# Altium PCB OFP_MCM_v1.6.PcbDoc (part 6 of 8)
Units mm, origin at the board's own origin, x right, y up, seen from the top; angles counter-clockwise.
Board outline 110 x 120 mm, 4 copper layers (Top Layer, Layer 1, Layer 2, Bottom Layer), stack 1.576 mm thick; 381 components, 285 nets, 1332 pads, 552 vias.
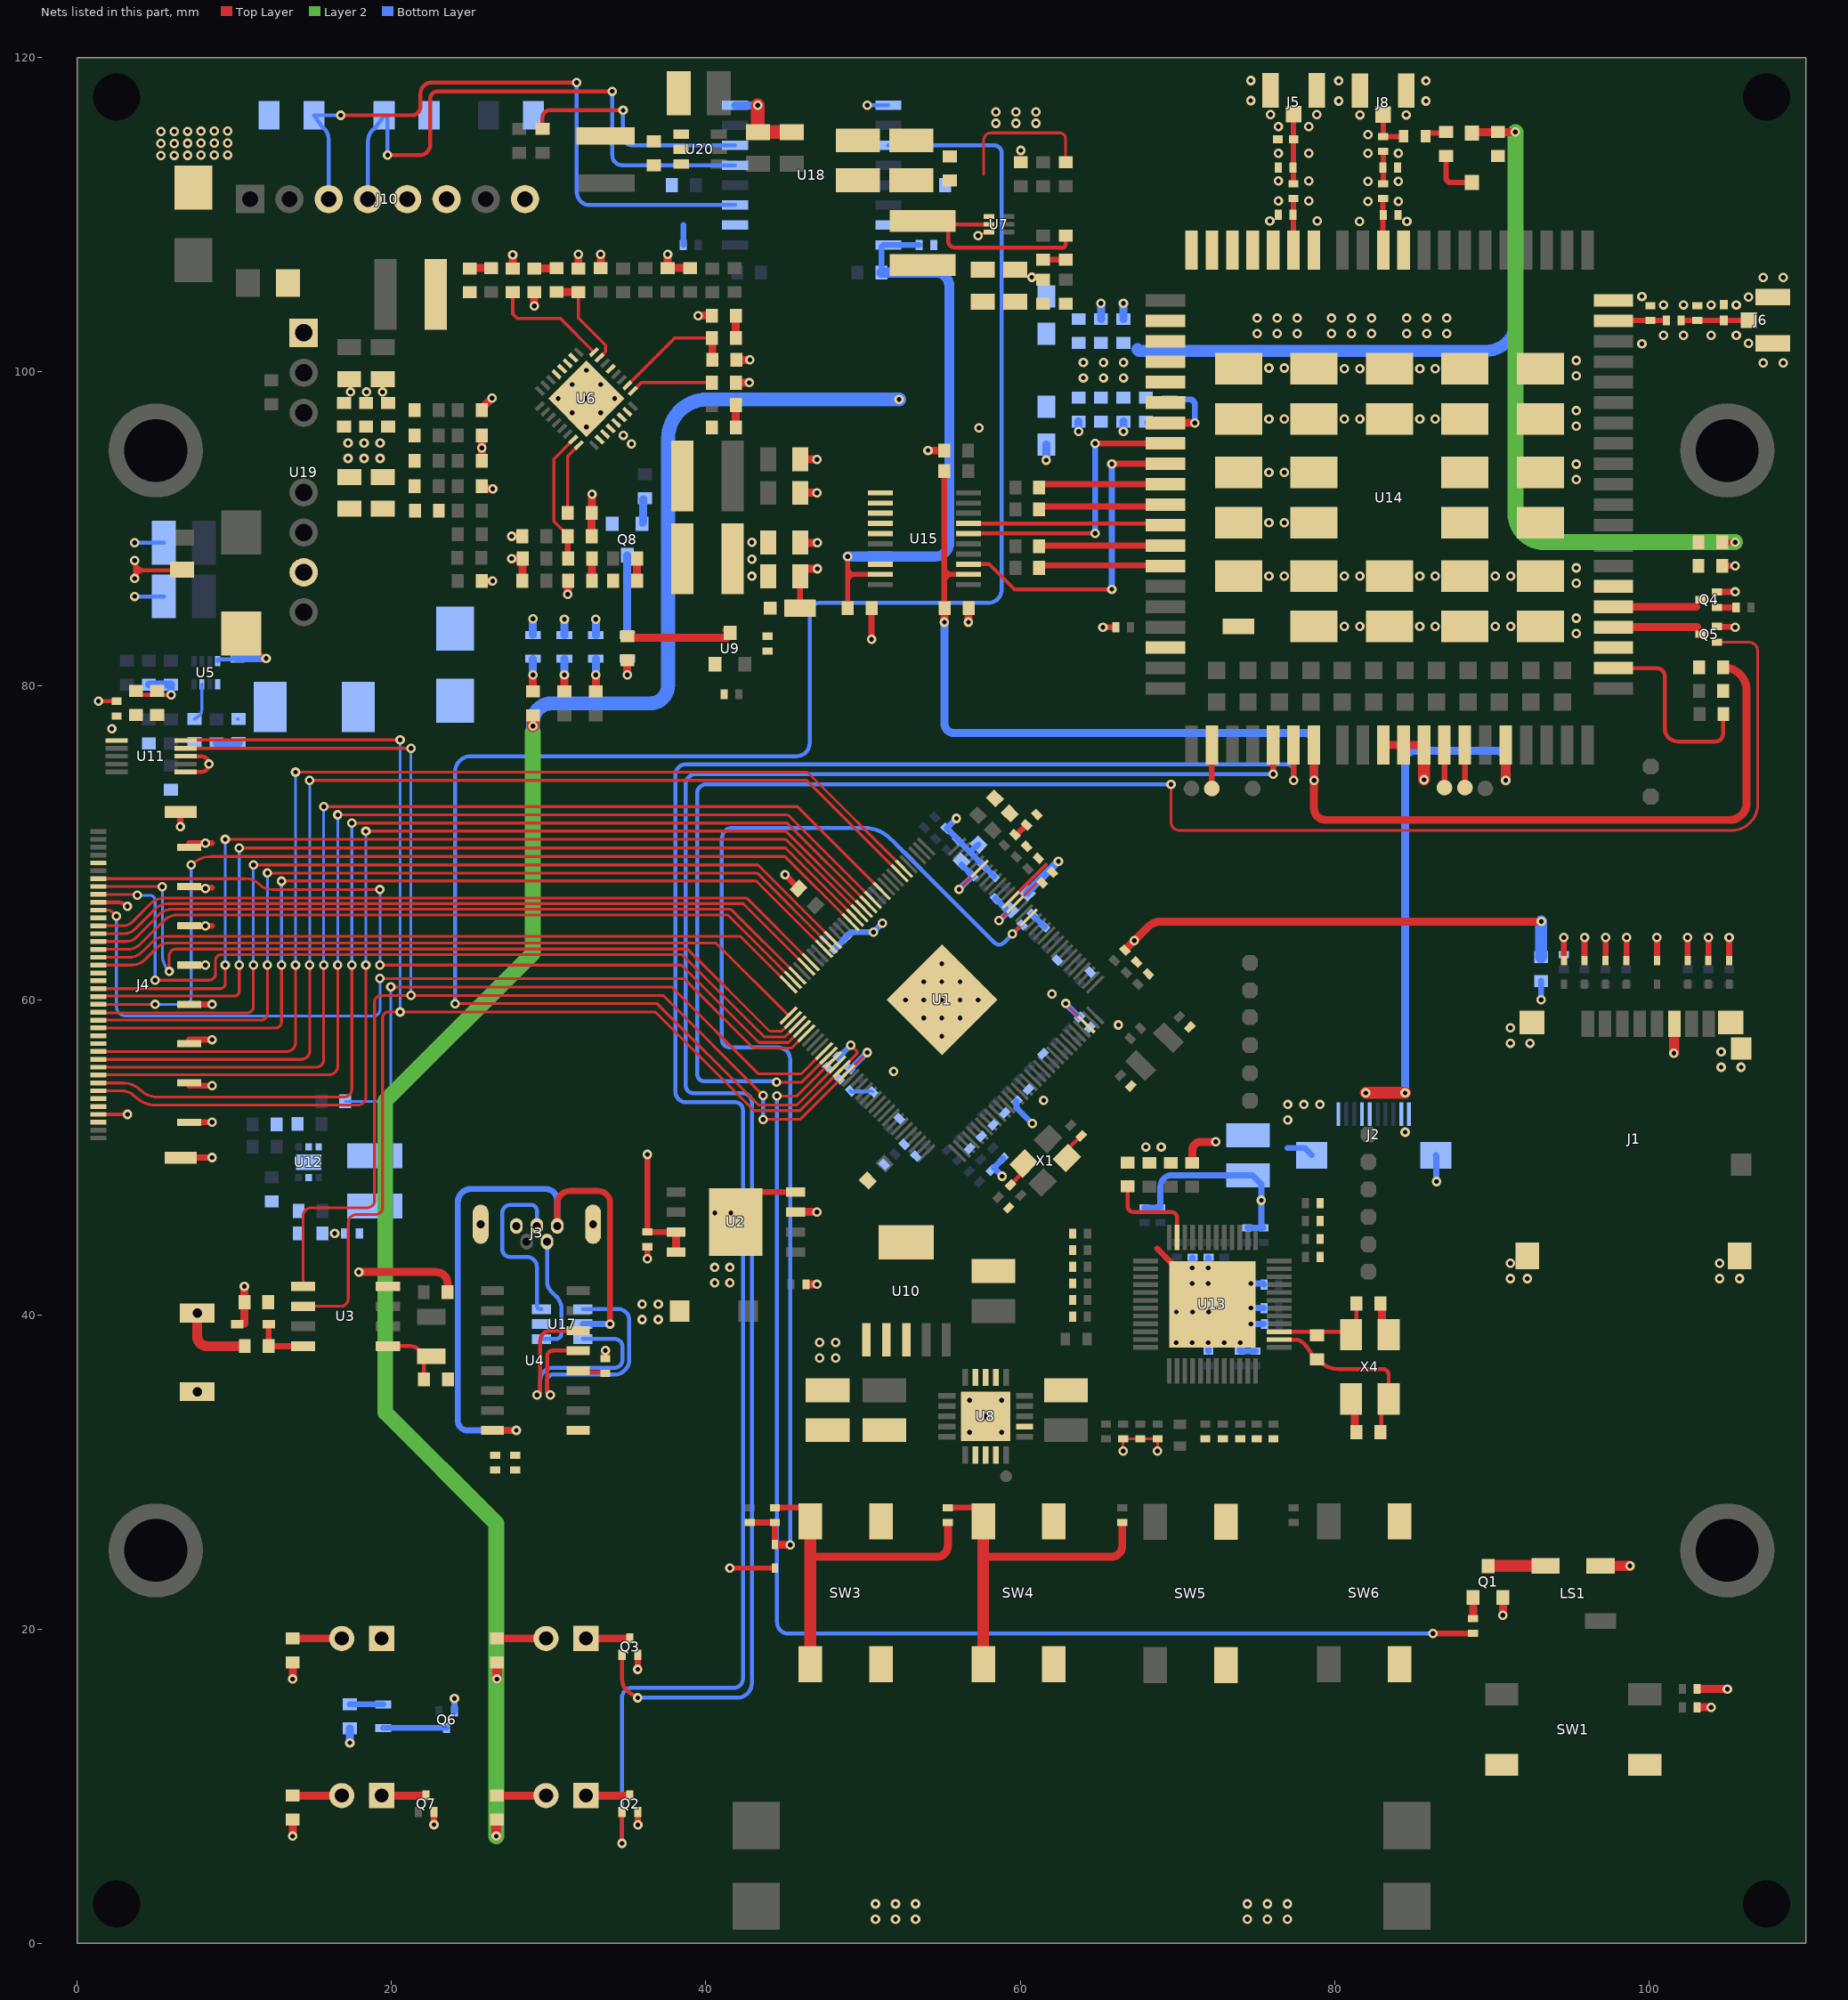
[diagram p5: the nets of this part, all layers, seen from the top]

## Via types
v1: diameter 0.6, hole 0.3, Top Layer to Bottom Layer, tented both sides, 552 vias

## Nets (pads, with @x,y where several pads share a name; then routed paths per layer and width w, separated by ;. In a path a pad name is that pad's centre, name@x,y a point inside that pad or via, vN(x,y) a via of type N, cw(c..) or ccw(c..) an arc to the next point about the centre after c; other vN are vias at no path point) (continued)
+3.3V: C4.2 C7.2 C9.2 C66.1 C67.2 C68.2 C87.2 C93.2 C94.2 C95.2 C140.2 C150.1 D9.1 D13.2 J4.4 J4.31 L3.2 LS1.1 R1.2 R8.2 R10.2 R18.1 R19.1 R20.1 R21.1 R28.1 R53.1 R77.2 R81.2 R120.2 R121.2 R124.2 U2.3 U2.7 U2.8 U9.3 U11.1 U15.19 U18.16 | length 106.4
  Top Layer w0.254: J4.4@1.345,52.75 v1(3.209,52.75) ; J4.31@1.345,66.25 2.545,66.25 cw(c2.545,65.338) 2.902,66.177 cw(c2.545,65.338) v1(3.191,65.983) ; 10.583,39.394 ccw(c10.583,39.448) 10.637,39.448 ; U9.3@41.144,83.566 cw(c41.144,83.003) U9.3@41.542,83.401 ; R28.1@66.663,63.202 R28.1@66.742,63.282
  Top Layer w0.305: C140.2@49.022,84.963 49.022,86.677 ; v1(49.022,88.249) 49.022,87.541 ; 49.073,87.109 49.454,87.109 ; U15.19@50.729,87.109 49.454,87.109 ; 49.022,86.677 cw(c49.454,86.677) 49.454,87.109 ; 49.022,86.677 49.022,87.541 ; 49.022,87.541 ccw(c49.454,87.541) 49.454,87.109
  Top Layer w0.381: C7.2@36.279,45.265 v1(36.279,50.201) ; C7.2@36.5,45.303 36.538,45.265 U2.7@38.115,45.265
  Top Layer w0.508: 10.637,39.448 v1(10.637,41.806) ; v1(13.716,6.815) R121.2@13.716,7.876 ; v1(13.716,16.815) R77.2@13.716,17.876 ; v1(17.917,42.718) 22.827,42.718 cw(c22.827,41.973) 23.572,41.973 R20.1@23.572,41.439 ; v1(27.64,88.119) R53.1@28.335,88.119 ; C66.1@28.33,86.705 28.335,86.71 R53.1@28.335,88.119 ; R53.1@28.34,88.124 R53.1@28.335,88.119 ; R81.2@35,83.185 35.111,83.073 U9.3@41.373,83.073 ; U2.8@38.115,43.995 U2.7@38.115,45.265 ; U2.3@45.715,46.535 47.066,46.535 v1(47.066,46.533) ; R10.2@46.438,41.935 v1(47.066,41.935) ; R28.1@66.742,63.282 66.742,63.292 v1(67.267,63.817) 68.131,64.68 cw(c68.959,63.854) 68.959,65.024 v1(93.164,65.024) ; R1.2@103.195,16.18 v1(105.004,16.18)
  Top Layer w0.635: LS1.1@96.933,24.015 v1(98.806,24.015)
  Bottom Layer w0.254: v1@17.305,12.713 ccw(c17.305,12.756) v1(17.349,12.756)
  Bottom Layer w0.381: R124.2@51.179,106.325 51.179,107.966 51.289,108.076 U18.16@51.611,108.076 C150.1@53.575,108.076
  Bottom Layer w0.508: v1(17.349,12.756) R120.2@17.349,13.678
  Bottom Layer w0.635: v1(49.022,88.249) 54.616,88.249 ccw(c54.616,89.122) 55.489,89.122 55.489,105.455 ccw(c54.62,105.455) 54.62,106.325 R124.2@51.179,106.325
  Bottom Layer w0.762: C4.2@93.157,62.769 v1@93.157,65.024
  other v1: 2.201,77.296 42.926,86.995 42.926,88.075 42.926,89.154
+3.8V: C81.2 C82.2 C83.2 C100.1 C101.2 C102.2 C103.2 C105.1 C106.2 C107.2 C108.2 C143.2 D11.1 L5.2 R61.2 R78.2 R97.2 R98.2 R99.2 R114.2 U14.57 U14.58 U14.59 U14.60 | length 202.1
  Top Layer w0.381: R99.2@104.686,89.157 v1@105.494,89.157
  Top Layer w0.508: D11.1@88.74,115.206 88.799,115.265 C143.2@90.399,115.265 v1(91.516,115.265)
  Top Layer w0.635: v1(26.665,6.815) 26.665,7.825 R97.2@26.716,7.876 ; v1(26.716,16.815) R98.2@26.716,17.876
  Top Layer w0.762: v1(29,77.463) R78.2@29,78.138
  Layer 2 w1.016: v1(26.665,6.815) 26.665,16.815 26.665,26.721 19.6,33.786 19.6,53.611 29,63.011 29,77.082 ; v1(91.516,115.265) 91.516,91.008 ccw(c93.364,91.008) 93.364,89.16 v1(105.497,89.16)
  Bottom Layer w0.762: 67.474,101.457 ccw(c67.585,101.457) 67.585,101.346 89.662,101.346 ccw(c89.662,103.2) 91.516,103.2 v1(91.516,115.265)
  Bottom Layer w0.889: v1(29,77.463) 29,77.73 cw(c30.171,77.73) 30.171,78.901 36.45,78.901 ccw(c36.45,80.05) 37.598,80.05 37.598,95.751 cw(c40.095,95.751) 40.095,98.247 v1(52.299,98.247)
  other v1: 64.024,99.619 65.3,99.619 66.573,99.619 64.024,100.601 65.3,100.601 66.573,100.601
+5V: C50.2 C51.2 C52.2 C57.2 C58.2 C59.2 C78.2 C79.2 C80.2 C89.2 C96.2 C97.2 C104.2 D12.2 J2.1 L1.2 L6.1 R41.2 R62.1 R69.2 R70.2 R71.2 R72.2 R82.2 R88.1 R96.2 U6.12 U6.13 U6.28 U6.29 U7.1 U10.1 U10.2 U12.2 | length 12.8
  Top Layer w0.178: 57.676,112.571 57.676,114.73 cw(c58.16,114.73) 58.16,115.214 62.509,115.214 cw(c62.509,114.827) 62.897,114.827 R62.1@62.897,113.333
  Top Layer w0.381: v1@65.27,83.75 R96.2@66.078,83.75
  Top Layer w0.508: R88.1@70.947,49.663 ccw(c70.947,49.688) 70.972,49.688 70.972,50.504 cw(c71.471,50.504) 71.471,51.003 v1(72.439,51.003)
  other v1: 47.238,37.244 48.26,37.244 47.238,38.227 48.26,38.227 77.027,52.395 77.027,53.377 78.049,53.377 79.068,53.377 65.267,83.746 17.232,94.496 18.254,94.496 19.273,94.496 35.271,95.416 17.232,95.479 18.254,95.479 19.273,95.479 34.752,95.965 58.462,115.824 59.738,115.824 61.011,115.824 58.462,116.553 59.738,116.553 61.011,116.553
+5VUSB: C23.2 C24.2 J3.1 U4.16 U17.5 | length 43.2
  Top Layer w0.381: U4.16@26.424,32.624 27.94,32.624 v1(27.94,32.639) ; J3.1@30.548,45.649 30.548,47.058 cw(c31.369,47.058) 31.369,47.879 33.147,47.879 cw(c33.147,47.117) 33.909,47.117 v1(33.909,39.406)
  Bottom Layer w0.381: v1(27.94,32.639) 24.84,32.639 cw(c24.84,33.265) 24.215,33.265 24.215,47.153 cw(c25.068,47.153) 25.068,48.006 29.802,48.006 cw(c29.802,47.26) 30.548,47.26 J3.1@30.548,45.649 ; U17.5@32.169,39.406 33.608,39.406
+EXT: C139.2 R103.2 R104.2 R111.2 U14.7 U15.2 | length 87.4
  Top Layer w0.305: 55.172,86.619 cw(c55.662,86.619) 55.662,87.109 ; 55.172,87.599 ccw(c55.662,87.599) 55.662,87.109 ; U15.2@56.71,87.109 55.662,87.109
  Top Layer w0.381: R104.2@55.172,93.684 55.172,86.619 55.172,85.109 ccw(c55.197,85.109) C139.2@55.197,85.084
  Top Layer w0.508: C139.2@55.165,85.108 55.173,85.1 55.173,84.081 v1(55.181,84.072) ; U14.7@78.7,76.25 v1(78.7,74) 78.7,72.239 ccw(c79.455,72.239) 79.455,71.484 105.139,71.484 ccw(c105.139,72.578) 106.233,72.578 106.233,79.705 ccw(c104.738,79.705) R103.2@104.738,81.2
  Bottom Layer w0.508: v1(55.181,84.072) 55.181,77.64 ccw(c55.804,77.64) 55.804,77.018 78.116,77.018 cw(c78.116,76.434) 78.7,76.434 v1(78.7,74)
+USIM: J2.4 J2.5 U14.14 | length 34.3
  Top Layer w0.635: v1(90.9,74) U14.14@90.9,76.25
  Top Layer w0.762: v1(81.999,54.114) v1(84.499,54.114)
  Bottom Layer w0.508: v1(84.499,54.114) 84.499,75.263 cw(c85.132,75.263) 85.132,75.895 90.26,75.895 cw(c90.26,75.255) 90.9,75.255 v1(90.9,74)
A_MASTER: 
AGND: C19.1 C20.1 C21.1 C22.1 R31.1 R37.1 U1.116 | length 7
  Top Layer w0.178: R31.1@59.69,70.519 R31.1@59.749,70.519
  Top Layer w0.229: U1.116@59.404,66.397 61.651,68.644
  Top Layer w0.381: R31.1@59.749,70.519 R37.1@60.399,71.169
  Bottom Layer w0.508: C20.1@60.441,66.857 v1@62.428,68.845
  other v1: 62.435,68.845
ANT_DIV: C142.2 R109.2 U14.35 | length 3.4
  Top Layer w0.178: U14.35@97.75,103.25 cw(c97.775,103.25) U14.35@97.775,103.275
  Top Layer w0.343: U14.35@97.775,103.275 R109.2@101.13,103.275
ANT_GNSS: C146.2 R113.2 U14.47 | length 3.3
  Top Layer w0.178: U14.47@83.092,107.758 U14.47@83.1,107.75
  Top Layer w0.343: U14.47@83.092,107.758 R113.2@83.092,111.03
ANT_MAIN: C138.2 R101.2 U14.49 | length 3.3
  Top Layer w0.343: R101.2@77.383,111.03 77.383,107.767 U14.49@77.4,107.75
AP_RDY: pad.2@72.2,73.492 U14.2 | length 2.8
  Top Layer w0.381: pad.2@72.2,73.492 U14.2@72.2,76.25
ATSAM_RX: D18.1 J10.4 U18.5 | length 38.5
  Top Layer w0.254: v1(19.75,113.792) 21.784,113.792 ccw(c21.784,114.468) 22.46,114.468 22.46,117.385 cw(c22.931,117.385) 22.931,117.856 v1(34.05,117.856)
  Bottom Layer w0.254: J10.4@18.5,111 18.5,114.677 cw(c19.528,114.677) 18.884,115.478 18.985,115.559 D18.1@19.528,116.332 cw(c19.528,116.11) 19.75,116.11 v1(19.75,113.792) ; v1(34.05,117.856) 34.05,113.78 ccw(c34.675,113.78) 34.675,113.156 U18.5@41.861,113.156
ATSAM_TX: D17.1 J10.3 U18.3 | length 41.4
  Top Layer w0.254: v1(16.764,116.332) 21.292,116.332 ccw(c21.292,116.884) 21.844,116.884 21.844,117.711 cw(c22.551,117.711) 22.551,118.417 v1(31.785,118.417)
  Bottom Layer w0.254: J10.3@16,111 16,114.812 ccw(c15.068,114.812) 15.611,115.569 D17.1@15.068,116.332 v1(16.764,116.332) ; v1(31.785,118.417) 31.785,111.456 ccw(c32.626,111.456) 32.626,110.616 U18.3@41.861,110.616
AVCC: C19.2 C20.2 R32.2 R33.1 U1.115 | length 7.7
  Top Layer w0.178: v1(58.648,65.076) U1.115@59.687,66.115 61.133,67.561 61.33,67.561 C19.2@61.371,67.52
  Bottom Layer w0.178: C20.2@59.13,65.78 C20.2@59.352,65.78
  Bottom Layer w0.381: R32.2@58.43,66.48 C20.2@59.13,65.78 ; v1@58.654,65.076 C20.2@59.256,65.679 ; R33.1@59.778,53.588 59.715,53.526 59.715,53.472 59.778,53.409 59.778,53.159 60.317,52.62 v1(60.777,52.161)
B_MASTER: 
BOOT: R110.1 U14.115 | length 12.6
  Top Layer w0.254: U14.115@97.75,81.15 100.511,81.15 cw(c100.511,80.645) 101.016,80.645 101.016,77.318 ccw(c101.854,77.318) 101.854,76.479 104.242,76.479 ccw(c104.242,76.962) 104.724,76.962 104.724,78.207 cw(c104.75,78.207) R110.1@104.75,78.232
BUZZER_EN: R17.1 U1.43 | length 82.7
  Top Layer w0.178: v1(44.529,53.921) 45.796,53.921 U1.43@48.091,56.215
  Top Layer w0.381: v1(86.269,19.704) 86.278,19.713 R17.1@88.813,19.713 ; R17.1@88.817,19.713 R17.1@88.813,19.713 ; R17.1@88.822,19.722 R17.1@88.813,19.713
  Bottom Layer w0.254: v1(44.529,53.921) 44.529,20.435 ccw(c45.253,20.435) 45.253,19.71 86.263,19.71 v1(86.269,19.704)
CH_3.3V: C13.2 U4.4 | length 1.8
  Top Layer w0.254: U4.4@31.873,36.444 31.992,36.326 C13.2@33.599,36.326
CH_U_N: U4.6 U17.6 | length 17
  Top Layer w0.254: v1(29.253,34.895) ccw(c29.253,35.106) 29.464,35.106 29.464,38.354 cw(c30.094,38.354) 30.094,38.984 U4.6@31.873,38.984
  Bottom Layer w0.254: v1(29.253,34.895) ccw(c29.253,35.106) 29.464,35.106 29.464,35.809 cw(c30.277,35.809) 30.277,36.622 34.183,36.622 ccw(c34.183,37.133) 34.693,37.133 34.693,37.963 ccw(c34.201,37.963) 34.201,38.456 U17.6@32.169,38.456
CH_U_P: U4.5 U17.4 | length 17.7
  Top Layer w0.254: v1(30.107,34.895) cw(c30.107,35.106) 29.896,35.106 29.896,37.338 cw(c30.272,37.338) 30.272,37.714 U4.5@31.873,37.714
  Bottom Layer w0.254: v1(30.107,34.895) cw(c30.107,35.106) 29.896,35.106 29.896,35.809 cw(c30.277,35.809) 30.277,36.19 34.183,36.19 ccw(c34.183,37.133) 35.125,37.133 35.125,39.662 ccw(c34.432,39.662) 34.432,40.356 U17.4@32.169,40.356
D_N: J3.2 U17.1 | length 7.6
  Bottom Layer w0.254: U17.1@29.549,38.456 30.439,38.456 ccw(c30.439,38.835) 30.818,38.835 30.818,40.356 ccw(c29.694,40.356) 30.489,41.151 30.176,41.463 cw(c30.847,42.134) 29.898,42.134 J3.2@29.898,44.649
D_P: J3.3 U17.3 | length 11.7
  Bottom Layer w0.254: J3.3@29.248,45.649 29.248,46.623 ccw(c28.881,46.623) 28.881,46.99 27.559,46.99 ccw(c27.559,46.482) 27.051,46.482 27.051,44.174 ccw(c27.548,44.174) 27.548,43.676 28.611,43.676 cw(c28.611,43.039) 29.248,43.039 29.248,40.656 29.248,40.574 ccw(c29.467,40.574) 29.467,40.356 U17.3@29.549,40.356
DBG_RXD: pad.2@87,73.542 U14.11 | length 2.8
  Top Layer w0.381: pad.2@87,73.492 pad.2@87,73.542 U14.11@87,76.25
DBG_TXD: pad.2@88.3,73.542 U14.12 | length 2.8
  Top Layer w0.381: pad.2@88.3,73.492 pad.2@88.3,73.542 U14.12@88.3,76.25
EC_CTS: R108.1 U14.64 | length 8
  Top Layer w0.381: R108.1@61.214,92.85 U14.64@69.25,92.85
EC_DCD: U14.63 U15.3 | length 21.2
  Top Layer w0.254: U15.3@56.71,87.759 58.041,87.759 59.633,86.167 v1(65.837,86.167)
  Top Layer w0.381: v1(65.837,94.15) U14.63@69.25,94.15
  Bottom Layer w0.381: v1(65.837,86.167) v1(65.837,94.15)
EC_DTR: U14.66 U15.7 | length 12.6
  Top Layer w0.178: U14.66@69.141,90.359 U14.66@69.25,90.25
  Top Layer w0.254: U15.7@56.71,90.359 U14.66@69.141,90.359
EC_PWR: Q4.3 R99.1 R100.1 U14.21 | length 5.3
  Top Layer w0.508: U14.21@97.75,85.05 103.023,85.05
EC_RI: U14.62 U15.6 | length 18.3
  Top Layer w0.178: U15.6@56.71,89.709 U15.6@56.726,89.725
  Top Layer w0.254: U15.6@56.726,89.725 v1(64.775,89.725)
  Top Layer w0.381: v1(64.775,95.45) U14.62@69.25,95.45
  Bottom Layer w0.381: v1(64.775,89.725) v1(64.775,95.45)
EC_RST: Q5.3 R103.1 U14.20 | length 5.3
  Top Layer w0.508: U14.20@97.75,83.75 103.082,83.75
EC_RTS: R107.1 U14.65 | length 8.2
  Top Layer w0.178: R107.1@61.214,91.258 R107.1@61.391,91.435 ; U14.65@69.135,91.435 U14.65@69.25,91.55
  Top Layer w0.381: R107.1@61.391,91.435 U14.65@69.135,91.435
EC_RXD: R105.1 U14.68 | length 8
  Top Layer w0.178: U14.68@69.219,87.681 U14.68@69.25,87.65
  Top Layer w0.381: R105.1@61.214,87.681 U14.68@69.219,87.681
EC_STATUS: LED8.2 U14.61 | length 4.8
  Top Layer w0.178: v1(71.12,96.748) v1@71.12,96.75
  Top Layer w0.508: U14.61@69.25,96.75 v1@71.12,96.75
  Bottom Layer w0.381: LED8.2@69.507,98.248 70.789,98.248 cw(c70.789,97.918) 71.12,97.918 v1(71.12,96.748)
EC_TXD: R106.1 U14.67 | length 8.1
  Top Layer w0.178: R106.1@61.214,89.056 R106.1@61.32,88.95
  Top Layer w0.381: R106.1@61.32,88.95 U14.67@69.25,88.95
GND: C1.1 C2.1 C3.1 C4.1 C5.1 C6.1 C7.1 C8.2 C9.1 C10.1 C11.1 C12.1 C13.1 C14.1 C15.1 C16.1 C17.1 C18.1 C23.1 C24.1 C25.1 C26.1 C27.1 C28.1 C29.1 C30.1 C31.1 C32.1 C33.1 C34.1 C35.1 C36.1 C37.1 C38.1 C39.1 C40.1 C41.1 C42.1 C43.1 C44.1 C45.1 C46.1 C47.1 C48.1 C49.1 C50.1 C51.1 C52.1 C56.1 C57.1 C58.1 C59.1 C60.1 C61.1 C62.2 C63.2 C64.1 C67.1 C68.1 C69.2 C70.2 C71.1 C74.1 C76.1 C77.1 C78.1 C79.1 C80.1 C81.1 C82.1 C83.1 C84.1 C85.2 C86.2 C87.1 C88.1 C89.1 C90.1 C91.1 C92.1 C93.1 C94.1 C95.1 C96.1 C97.1 C98.1 C99.1 C100.2 C101.1 C102.1 C103.1 C104.1 C105.2 C106.1 C107.1 C108.1 C109.1 C110.1 C111.1 C112.1 C113.1 C114.1 C115.1 C116.1 C117.1 C118.1 C119.1 C120.1 C121.1 C122.1 C123.1 C124.1 C125.1 C126.1 C127.1 C128.1 C129.1 C130.1 C131.1 C132.1 C133.1 C134.1 C135.1 C136.1 C137.1 C138.1 C139.1 C140.1 C141.1 C142.1 C143.1 C145.1 C146.1 C150.2 C156.1 C157.2 D1.1 D2.1 D3.1 D4.1 D5.1 D6.1 D7.1 D8.1 D10.1 D12.1 D13.1 D15.2 D16.2 J1.6 J1.DN J1.SH1 J1.SH2 J1.SH3 J1.SH4 J2.9 J2.10 J2.MP1 J2.MP2 J3.5 J3.SH1 J3.SH2 J4.3 J4.5 J4.6 J4.13 J4.14 J4.21 J4.22 J4.29 J4.36 J4.41 J4.42 J4.43 J4.44 J4.45 J4.46 J4.47 J4.48 J4.49 J4.50 J5.2 J5.3 J6.2 J6.3 J8.2 J8.3 LED1.1 LED2.2 LED3.2 LED4.2 Q1.2 Q2.1 Q3.1 Q4.1 Q5.1 Q6.1 Q7.1 Q8.1 R9.2 R29.1 R30.1 R37.2 R43.2 R44.1 R45.1 R48.2 R54.2 R60.2 R63.1 R64.1 R68.1 R73.1 R74.1 R75.1 R76.1 R85.1 R86.1 R87.1 R89.1 R90.1 R91.1 R95.1 R100.2 R102.2 R127.2 SW1.3 SW1.4 SW2.2 SW3.1 SW3.2 SW4.1 SW4.2 SW5.1 SW5.2 SW6.1 SW6.2 U1.129 U2.4 U2.9 U3.4 U4.1 U5.4 U6.11 U6.14 U6.21 U6.27 U6.33 U7.3 U8.2 U8.3 U8.4 U8.12 U8.13 U8.14 U8.17 U8.21 U9.1 U10.3 U10.6 U11.6 U11.8 U12.5 U12.7 U13.49 U14.8 U14.9 U14.10 U14.19 U14.22 U14.36 U14.46 U14.48 U14.50 U14.51 U14.52 U14.53 U14.54 U14.56 U14.72 U14.85 U14.86 U14.87 U14.88 U14.89 U14.90 U14.91 U14.92 U14.93 U14.94 U14.95 U14.96 U14.97 U14.98 U14.99 U14.100 U14.101 U14.102 U14.103 U14.104 U14.105 U14.106 U14.107 U14.108 U14.109 U14.110 U14.111 U14.112 U15.11 U17.2 U18.9 U18.15 U19.7 X1.2 X1.4 X4.2 X4.4 | length 172
  Top Layer w0.178: v1(57.319,108.673) 57.433,108.673 57.591,108.83 57.95,108.83 U7.3@58.011,108.891 ; v1(66.552,31.327) R68.1@66.552,32.108 R87.1@67.64,32.108 C117.1@68.746,32.108 v1(68.746,31.327) ; U13.49@70.895,42.833 72.779,42.13 73.963,41.688 U13.49@72.232,40.667 cw(c72.232,41.952) 72.191,40.667 cw(c72.232,41.952) 72.157,40.669 cw(c72.232,41.952) 70.947,41.914 cw(c72.232,41.952) 70.947,41.952 v1(70.947,41.991) ; Q5.1@104.349,83.803 Q5.1@104.356,83.81
  Top Layer w0.254: v1(1.35,79.045) C95.1@2.501,79.045 ; v1@3.671,86.863 v1@3.671,87.934 ; v1@3.679,86.867 cw(c4.278,86.768) 4.277,87.376 ; C93.1@3.73,79.693 ccw(c3.982,79.693) 3.982,79.441 v1(5.968,79.441) ; 3.771,87.376 4.277,87.376 ; C156.1@6.356,87.376 C156.1@6.039,87.376 ; C156.1@6.674,87.427 C156.1@6.039,87.376 ; U11.6@6.901,74.545 7.882,74.545 ccw(c7.882,75.045) v1(8.382,75.045) ccw(c7.882,75.045) 7.882,75.545 U11.8@6.901,75.545 ; C157.2@10.44,83.345 11.598,82.077 v1(12.021,81.77) ; R76.1@25.74,92.717 R76.1@25.747,92.71 ; Q3.1@35.666,18.35 Q3.1@35.677,18.34 ; C2.1@59.386,48.258 60.221,49.093 X1.2@60.221,49.623 ; X1.4@62.979,49.977 62.979,50.484 C1.1@63.882,51.388 ; v1(103.962,15.011) v1@103.962,15.015 ; v1@3.671,87.934 v1(3.661,87.995) 3.671,87.984 v1@3.671,87.934 ; v1@3.671,87.934 3.679,87.885 ccw(c4.278,87.984) 4.277,87.376 ; 4.277,87.376 ccw(c4.278,87.984) 4.278,87.376 ccw(c4.278,86.768) 4.277,87.376 ; 4.277,87.376 4.279,87.376 C156.1@6.039,87.376
  Top Layer w0.305: v1@41.529,23.873 44.397,23.873 D10.1@44.4,23.87
  Top Layer w0.381: v1(6.561,71.062) 6.561,71.966 J4.49@6.595,72 ; J4.50@6.595,50 v1(8.585,50) ; J4.45@6.686,62.25 J4.45@7.12,62.25 v1(8.151,62.25) ; J4.41@7.12,52.25 v1(8.585,52.25) ; J4.42@7.12,54.572 v1(8.585,54.572) ; 7.12,57.504 v1(8.585,57.504) ; J4.44@7.12,59.75 v1(8.585,59.75) ; J4.46@7.12,64.75 8.585,64.75 ; J4.47@7.12,67.174 8.585,67.174 ; 7.12,70.004 8.585,70.004 ; v1(22.7,7.547) Q7.1@22.7,8.35 ; v1@35.666,7.547 Q2.1@35.666,8.35 ; v1(35.666,17.43) 35.666,18.329 Q3.1@35.677,18.34 ; v1(36.279,43.561) C7.1@36.279,44.325 ; U2.9@41.915,45.9 41.915,46.296 43.424,47.805 U2.4@45.715,47.805 ; v1(45.041,68.005) 45.704,67.342 C37.1@45.898,67.122 ; D13.1@45.994,84.963 45.999,84.963 C68.1@45.999,86.995 C68.1@46.028,86.966 ; C67.1@45.999,89.154 C67.1@46.028,89.125 ; v1(50.546,82.987) C140.1@50.546,84.963 ; 68.722,44.211 69.677,43.226 70.89,41.973 U13.49@70.909,41.954 ; D1.1@94.598,62.524 v1(94.598,64.008) ; D6.1@95.917,62.524 v1(95.917,64.008) ; D7.1@97.25,62.524 v1(97.25,64.008) ; D3.1@98.582,62.524 v1(98.582,64.008) ; D2.1@100.522,62.524 v1(100.522,64.008) ; D4.1@102.476,62.524 v1(102.476,64.008) ; D5.1@103.796,62.524 v1(103.796,64.008) ; Q4.1@104.349,86.003 v1(105.494,86.003) ; Q5.1@104.356,83.81 104.39,83.776 105.467,83.776 v1(105.494,83.75) ; R100.2@104.686,87.657 v1@105.494,87.657 ; D8.1@105.117,62.524 v1(105.117,64.008)
  Top Layer w0.508: C51.1@17.272,91.248 C51.1@17.308,91.284 ; C64.1@25.74,86.692 v1(26.434,86.692) ; R76.1@25.747,92.558 v1(26.441,92.558) ; R75.1@25.747,94.461 v1(25.747,95.155) R74.1@25.747,95.955 ; R73.1@25.913,97.845 v1(26.404,98.336) ; v1(27.636,89.541) R54.2@28.33,89.541 ; C71.1@27.714,106.587 v1(27.714,107.454) ; v1(29.083,104.197) C63.2@29.083,105.063 ; v1@31.219,85.849 C70.2@31.219,86.705 ; C62.2@31.891,106.587 v1@31.891,107.454 ; C69.2@32.737,89.541 C74.1@32.737,91.034 32.748,91.044 32.748,92.08 v1@32.758,92.091 ; R48.2@33.312,106.613 v1(33.312,107.479) ; v1(37.574,107.479) R64.1@37.574,106.613 R60.2@38.969,106.613 ; v1(39.517,103.577) C86.2@40.384,103.577 ; C84.1@41.908,99.315 v1(42.775,99.315) ; C85.2@41.939,100.766 v1(42.805,100.766) ; C77.1@45.999,92.304 v1(47.07,92.304) ; C76.1@45.999,94.431 v1(47.07,94.431) ; C68.1@46.028,87.474 v1(47.099,87.474) ; C67.1@46.028,89.125 v1(47.099,89.125) ; v1@54.144,94.992 R102.2@55.163,94.992 ; v1(56.71,84.072) 56.715,84.078 56.715,85.078 C139.1@56.721,85.084 ; C109.1@81.309,32.628 X4.4@81.309,34.086 ; C110.1@82.929,40.711 83.025,40.615 83.025,39.157 X4.2@83.451,38.731 ; U14.8@83.1,76.25 U14.9@84.4,76.25 U14.10@85.7,76.25 ; v1(90.722,20.873) Q1.2@90.722,22.006 ; C3.1@103.164,15.015 v1@103.962,15.015
  Top Layer w0.559: C13.1@33.608,37.338 v1(33.608,37.719)
  Top Layer w0.635: v1@101.622,56.664 J1.6@101.622,58.505
  Top Layer w0.762: v1(85.7,74.05) U14.10@85.7,76.25
  Bottom Layer w0.178: C39.1@49.272,54.183 49.415,54.183 49.469,54.183 C39.1@49.496,54.209 ; C42.1@50.322,54.209 50.362,54.249 50.56,54.249 C42.1@50.623,54.186
  Bottom Layer w0.254: v1(3.661,85.712) 4.88,85.712 C48.1@5.515,85.712 ; v1(3.661,89.136) C47.1@5.515,89.136 ; v1@5.962,79.441 v1(5.968,79.441) ; U5.4@8.936,81.592 8.936,81.667 8.969,81.7 9.906,81.7 C49.1@10.071,81.865 ; C39.1@49.209,54.246 C39.1@49.272,54.183 ; C39.1@49.415,54.183 49.449,54.216 C42.1@50.315,54.216 ; v1(50.268,116.966) U18.9@51.611,116.966
  Bottom Layer w0.381: Q6.1@24.004,14.749 v1(24.004,15.572) ; C38.1@48.208,63.288 49.275,64.355 v1(50.67,64.355) v1(51.236,64.92) ; v1(55.945,71.585) 55.326,70.967 55.409,70.878 55.954,70.332 C34.1@56.02,70.219 56.11,70.129 56.794,69.445 ; C11.1@57.356,69.931 56.794,69.445 ; C31.1@58.356,67.883 58.266,67.973 C12.1@57.643,68.596 56.794,69.445 ; v1(58.86,48.811) 58.319,49.351 58.916,49.949 C17.1@58.922,49.949 ; C26.1@60.785,65.48 60.863,65.379 61.468,64.774 C27.1@61.556,64.683 ; C124.1@67.912,46.798 C126.1@68.926,46.798 68.926,48.153 cw(c69.645,48.153) 69.645,48.872 C104.1@74.498,48.872 74.775,48.872 75.346,48.301 v1(75.346,47.282) 75.346,45.645 ccw(c75.465,45.645) 75.465,45.526 C128.1@74.451,45.526 ; v1(70.947,42.973) 70.961,42.987 70.961,43.632 C112.1@70.975,43.647 ; v1@71.969,38.373 71.976,38.367 71.976,37.693 C130.1@71.982,37.687 ; v1(71.969,42.973) 71.979,42.983 71.979,43.637 C113.1@71.989,43.647 ; v1@74.013,38.373 73.998,38.358 73.998,37.702 C134.1@73.982,37.687 C132.1@74.982,37.687 ; v1@74.552,39.412 v1(74.679,39.412) 75.499,39.412 C116.1@75.537,39.417 ; v1@74.552,40.435 v1(74.679,40.435) 75.479,40.435 C115.1@75.517,40.417 ; v1@74.552,41.991 v1(74.679,41.991) 75.479,41.991 C125.1@75.517,41.917 ; 77.027,50.616 78.091,50.616 J2.MP2@78.549,50.158 ; J2.MP1@86.449,50.158 86.487,50.12 v1(86.487,48.471) ; v1(93.157,60.049) C4.1@93.157,61.245
  Bottom Layer w0.508: R43.2@4.562,80.095 R45.1@5.962,80.095 v1@5.962,79.441 ; C49.1@10.071,81.865 10.166,81.77 v1@11.996,81.77 ; LED2.2@29,83.278 v1(29,84.282) ; LED3.2@31,83.25 v1(31,84.254) ; LED4.2@33,83.25 v1(33,84.254) ; v1(61.664,94.38) C105.2@61.664,95.384 ; v1(63.719,96.215) C106.1@63.719,96.838 ; C102.1@65.146,103.362 v1(65.146,104.366) ; v1(66.573,96.215) C108.1@66.573,96.838 ; C103.1@66.573,103.362 v1(66.573,104.366)
  other v1: 50.794,1.524 52.07,1.524 53.343,1.524 74.457,1.524 75.73,1.524 77.006,1.524 50.794,2.507 52.07,2.507 53.343,2.507 74.457,2.507 75.73,2.507 77.006,2.507 35.677,7.536 41.529,23.876 56.789,32.52 58.827,32.52 57.808,33.539 56.789,34.558 58.827,34.558 69.925,38.221 70.947,38.221 71.969,38.221 72.991,38.221 74.013,38.221 35.95,39.695 36.973,39.695 69.944,40.175 70.967,40.175 71.989,40.175 35.95,40.677 36.973,40.677 71.969,41.991 40.566,42.028 41.529,42.028 91.198,42.299 92.272,42.299 104.499,42.299 105.772,42.299 40.566,43.01 41.529,43.01 91.198,43.282 104.499,43.282 16.385,45.176 40.566,46.473 41.589,46.473 67.997,50.679 68.979,50.679 84.499,51.615 61.496,53.647 51.953,55.482 104.604,55.753 105.877,55.753 101.6,56.642 104.604,56.736 91.198,57.276 92.445,57.276 55.02,57.726 91.198,58.259 66.256,58.443 53.866,58.88 55.02,58.88 56.174,58.88 52.712,60.034 53.866,60.034 55.02,60.034 56.174,60.034 57.328,60.034 62.019,60.406 53.866,61.188 55.02,61.188 56.174,61.188 55.02,62.342 8.151,64.75 8.151,67.123 8.151,70.004 95.394,83.347 80.632,83.797 81.615,83.797 85.432,83.797 86.415,83.797 90.232,83.797 91.215,83.797 95.394,84.329 31.209,85.838 95.394,86.547 3.661,86.853 75.832,86.997 76.815,86.997 80.632,86.997 81.615,86.997 85.432,86.997 86.415,86.997 90.232,86.997 91.215,86.997 95.394,87.529 105.497,87.66 75.832,90.397 76.815,90.397 32.758,92.218 95.394,93.147 75.832,93.597 76.815,93.597 95.394,94.129 54.136,95 57.379,96.438 32.4,96.5 95.394,96.547 75.832,96.997 76.815,96.997 80.632,96.997 81.615,96.997 85.432,96.997 86.415,96.997 31.5,97.4 33.3,97.4 95.394,97.529 30.6,98.3 32.4,98.3 34.2,98.3 17.386,98.721 18.409,98.721 19.428,98.721 31.5,99.2 33.3,99.2 95.394,99.747 32.4,100.1 80.632,100.197 81.615,100.197 85.432,100.197 86.415,100.197 75.832,100.247 76.815,100.247 107.275,100.568 108.551,100.568 95.394,100.729 99.567,101.782 106.35,101.817 100.943,102.322 102.216,102.322 103.972,102.322 105.569,102.322 75.073,102.438 76.349,102.438 77.622,102.438 79.803,102.438 81.079,102.438 82.352,102.438 84.597,102.438 85.873,102.438 87.146,102.438 75.073,103.421 76.349,103.421 77.622,103.421 79.803,103.421 81.079,103.421 82.352,103.421 84.597,103.421 85.873,103.421 87.146,103.421 100.943,104.262 102.216,104.262 103.972,104.262 105.569,104.262 106.35,104.767 99.567,104.802 60.74,106.021 107.275,106.016 108.551,106.016 31.891,107.479 81.59,109.575 84.61,109.575 75.89,109.6 78.91,109.6 82.13,110.85 84.07,110.85 76.43,110.875 78.37,110.875 82.13,112.123 84.07,112.123 76.43,112.148 78.37,112.148 76.43,113.904 78.37,113.904 82.13,113.904 84.07,113.904 60.043,114.094 82.13,115.1 76.43,115.603 78.37,115.603 81.625,116.358 84.575,116.358 75.925,116.383 78.875,116.383 80.274,117.241 85.824,117.241 74.676,117.266 80.274,118.517 85.824,118.517 74.676,118.542
GND-IN: C149.1 C152.1 C153.1 C154.1 C155.1 D14.1 D17.2 D18.2 D19.2 J10.8 R126.1 U18.2 U18.8 U19.1 U20.4 | length 6.6
  Top Layer w0.889: v1(43.307,116.966) C155.1@43.307,115.265 C154.1@45.466,115.265
  Bottom Layer w0.381: C149.1@38.568,108.076 38.568,109.346
  Bottom Layer w0.508: U18.8@41.861,116.966 v1(43.307,116.966)
  other v1: 5.325,113.771 6.174,113.778 7.024,113.785 7.874,113.792 8.724,113.799 9.574,113.806 5.325,114.533 6.174,114.54 7.024,114.547 7.874,114.554 8.724,114.561 9.574,114.568 5.325,115.295 6.174,115.302 7.024,115.309 7.874,115.316 8.724,115.323 9.574,115.33
GSM_CTS: U15.12
GSM_DCD: U15.18
GSM_DTR: U15.14
GSM_PWR: Q4.2 R117.1 | length 1.2
  Top Layer w0.381: Q4.2@104.349,85.002 R117.1@105.554,85.003
GSM_RI: U15.15
GSM_RST: Q5.2 U1.42 | length 111.2
  Top Layer w0.178: v1(44.505,54.797) 46.106,54.797 U1.42@47.808,56.498 ; v1(69.6,73.746) 69.6,71.357 ccw(c70.142,71.357) 70.142,70.815 105.258,70.815 ccw(c105.258,72.492) 106.934,72.492 106.934,82.226 ccw(c106.358,82.226) 106.358,82.802 Q5.2@104.349,82.802
  Bottom Layer w0.254: v1@44.428,54.86 39.901,54.86 cw(c39.901,55.315) 39.446,55.315 39.446,73.186 cw(c40.006,73.186) 40.006,73.746 v1(69.6,73.746)
GSM_RTS: U15.13
HPVCCBP: C11.2 C12.2 U1.123 | length 4.1
  Top Layer w0.178: v1(56.116,67.069) U1.123@57.424,68.377
  Bottom Layer w0.381: v1@56.117,67.069 C12.2@56.991,67.944 ; C11.2@56.278,68.632 C12.2@56.979,67.931
HUB_XI: C109.2 R93.1 U13.38 X4.1 | length 11.7
  Top Layer w0.254: U13.38@76.495,38.429 77.155,38.415 77.525,38.407 cw(c77.52,38.153) 77.528,38.407 cw(c77.497,37.653) 78.03,38.187 cw(c75.979,36.134) 78.578,37.424 R93.1@78.895,37.17 79.204,36.916 ccw(c80.195,38.066) 80.195,36.548 83.062,36.548 cw(c83.062,36.16) 83.451,36.16 X4.1@83.451,34.631 82.984,34.164 82.984,32.587 C109.2@82.929,32.532
HUB_XO: C110.2 R93.2 U13.39 X4.3 | length 6.6
  Top Layer w0.178: X4.3@81.051,38.731 X4.3@81.405,39.085
  Top Layer w0.254: U13.39@76.482,38.917 R93.2@78.641,38.917 ; R93.2@78.895,38.694 79.118,38.917 80.866,38.917 X4.3@81.051,38.731 ; X4.3@81.405,39.085 C110.2@81.405,40.711
I2C0_SCL: R18.2 U1.45 U3.6 U11.10 | length 90.1
  Top Layer w0.178: U11.10@6.901,76.545 6.937,76.581 v1(20.549,76.581) ; U3.6@14.37,40.536 16.764,40.536 ccw(c16.764,41.019) 17.247,41.019 17.247,45.849 cw(c17.776,45.849) 17.776,46.378 18.988,46.378 ccw(c18.988,46.821) 19.431,46.821 19.431,58.882 cw(c19.815,58.882) 19.815,59.266 v1(20.549,59.266) 36.791,59.266 43.067,52.99 45.997,52.99 U1.45@48.657,55.65 49.571,56.564 ccw(c49.447,56.688) 49.571,56.812 v1(49.231,57.152)
  Bottom Layer w0.178: v1(20.549,59.266) v1(20.549,76.581)
  Bottom Layer w0.381: R18.2@48.451,56.332 48.451,56.377 v1@49.226,57.152
I2C0_SDA: R19.2 U1.46 U3.5 U11.9 | length 91.3
  Top Layer w0.178: U11.9@6.901,76.045 v1(21.234,76.045) ; U3.5@14.37,41.806 14.37,46.291 cw(c14.877,46.291) 14.877,46.798 18.439,46.798 ccw(c18.439,47.283) 18.923,47.283 18.923,59.9 cw(c19.341,59.9) 19.341,60.318 v1(21.234,60.318) 37.282,60.318 v1(43.649,53.952) ; v1@43.622,52.432 v1(43.649,52.432) 46.004,52.432 U1.46@48.939,55.367 ; U1.46@48.939,55.367 v1@50.261,56.689
  Bottom Layer w0.178: v1(21.234,60.318) v1(21.234,76.045)
  Bottom Layer w0.254: v1(43.649,52.432) v1(43.649,53.952)
  Bottom Layer w0.381: R19.2@49.205,55.578 49.205,55.632 v1@50.257,56.684
  other v1: 50.266,56.684
KEYADC0: C26.2 D10.2 R11.1 R13.1 U1.112 | length 77.1
  Top Layer w0.178: v1(59.497,64.228) U1.112@60.535,65.266
  Top Layer w0.381: R11.1@42.8,26.783 R13.1@44.4,26.783 D10.2@44.4,25.369
  Top Layer w0.508: D10.2@44.458,25.362 45.357,25.362 v1@45.358,25.361
  Bottom Layer w0.254: v1@45.361,25.362 45.361,56.273 ccw(c44.63,56.273) 44.63,57.003 41.533,57.003 cw(c41.533,57.515) 41.021,57.515 41.021,70.308 cw(c41.696,70.308) 41.696,70.984 50.088,70.984 cw(c50.088,68.683) 51.294,70.642 cw(c50.088,68.683) 51.715,70.31 cw(c47.473,65.373) 52.081,69.97 52.087,69.964 58.375,63.675 ccw(c58.673,63.97) 58.969,63.675 v1@59.51,64.215 ; v1@59.505,64.219 60.012,64.726 C26.2@60.12,64.815
  other v1: 45.364,25.355
LCD_CLK: J4.30 U1.37 | length 55.5
  Top Layer w0.178: J4.30@1.345,65.75 1.942,65.75 cw(c1.942,65.34) 2.231,65.63 v1(2.495,65.366) ; v1(19.264,61.395) 38.605,61.395 43.03,56.97 45.451,56.97 U1.37@46.394,57.913
  Bottom Layer w0.178: v1(2.495,65.366) 2.495,59.608 ccw(c3.099,59.608) 3.099,59.004 18.847,59.004 ccw(c18.847,59.422) 19.264,59.422 v1@19.264,61.141
LCD_D2: J4.23 U1.33 | length 46.3
  Top Layer w0.178: J4.23@1.345,62.25 3.47,62.25 ccw(c3.47,63.436) 4.308,62.597 5.072,63.361 ; 5.072,63.361 cw(c5.782,62.651) 5.782,63.655 6.198,63.655 40.651,63.655 U1.33@45.262,59.044
LCD_D3: J4.24 U1.32 | length 45.6
  Top Layer w0.178: J4.24@1.345,62.75 3.309,62.75 ccw(c3.309,63.937) 4.148,63.097 ; 4.148,63.098 4.758,63.707 cw(c5.629,62.837) 5.629,64.068 42.217,64.068 U1.32@45.262,61.023
LCD_D4: J4.25 U1.31 | length 46.7
  Top Layer w0.178: J4.25@1.345,63.25 3.19,63.25 ccw(c3.19,64.436) 4.029,63.597 5.519,65.088 cw(c6.358,64.249) 6.358,65.435 41.416,65.435 41.468,65.383 U1.31@45.545,61.306
LCD_D5: J4.26 U1.30 | length 47
  Top Layer w0.178: J4.26@1.345,63.75 3.118,63.75 ccw(c3.118,64.67) 3.767,64.019 ; 3.768,64.019 5.224,65.476 cw(c6.011,64.691) 6.011,65.802 41.615,65.802 U1.30@45.828,61.589
LCD_D6: J4.27 U1.28 | length 47.4
  Top Layer w0.178: J4.27@1.345,64.25 2.998,64.25 ccw(c2.998,65.177) 3.654,64.522 4.953,65.821 cw(c5.766,65.008) 5.766,66.158 6.358,66.158 42.391,66.158 42.443,66.105 U1.28@46.394,62.155
LCD_D7: J4.28 U1.27 | length 47.7
  Top Layer w0.178: J4.28@1.345,64.75 2.929,64.75 ccw(c2.929,65.531) 3.481,64.978 ; 3.481,64.979 4.66,66.158 ; 4.661,66.158 cw(c5.526,65.291) 5.526,66.516 6.358,66.516 42.598,66.516 42.65,66.464 U1.27@46.677,62.438
LCD_D10: J4.15 U1.24 | length 57.2
  Top Layer w0.178: J4.15@1.345,58.25 12.629,58.25 ccw(c12.629,58.619) 12.998,58.619 v1(12.998,62.25) ; v1@12.954,67.59 12.969,67.605 43.206,67.605 U1.24@47.525,63.286
  Bottom Layer w0.178: v1(12.998,62.25) v1(12.998,67.59)
LCD_D11: J4.16 U1.23 | length 57.5
  Top Layer w0.178: J4.16@1.345,58.75 11.695,58.75 ccw(c11.695,59.158) 12.103,59.158 v1(12.103,62.25) ; v1(12.103,68.106) 43.271,68.106 U1.23@47.808,63.569
  Bottom Layer w0.178: v1(12.103,62.25) v1(12.103,68.106)
LCD_D12: J4.17 U1.22 | length 58
  Top Layer w0.178: J4.17@1.345,59.25 1.378,59.217 10.84,59.217 ccw(c10.84,59.584) 11.208,59.584 v1(11.208,62.25) ; v1(11.208,68.622) 43.321,68.622 U1.22@48.091,63.852
  Bottom Layer w0.178: v1(11.208,62.25) v1(11.208,68.622)
LCD_D13: J4.18 U1.18 | length 58.4
  Top Layer w0.178: J4.18@1.345,59.75 v1(4.953,59.75) ; v1(7.252,68.622) cw(c8.56,67.314) 8.56,69.164 23.592,69.164 45.042,69.164 U1.18@49.222,64.983
  Bottom Layer w0.178: v1(4.953,59.75) 6.8,59.75 ccw(c6.8,60.202) 7.252,60.202 v1(7.252,68.622)
LCD_D14: J4.19 U1.17 | length 59.3
  Top Layer w0.178: J4.19@1.345,60.25 1.373,60.278 9.986,60.278 ccw(c9.986,60.604) 10.312,60.604 v1(10.312,62.25) ; v1(10.312,69.7) 23.592,69.7 45.071,69.7 U1.17@49.505,65.266
  Bottom Layer w0.178: v1(10.312,62.25) v1(10.312,69.7)
LCD_D15: J4.20 U1.16 | length 59.7
  Top Layer w0.178: J4.20@1.345,60.75 9.09,60.75 ccw(c9.09,61.077) 9.417,61.077 v1(9.417,62.25) ; v1(9.417,70.25) 45.086,70.25 U1.16@49.788,65.549
  Bottom Layer w0.178: v1(9.417,62.25) v1(9.417,70.25)
LCD_D18: J4.7 U1.15 | length 68.2
  Top Layer w0.178: J4.7@1.345,54.25 2.818,54.25 cw(c2.818,53.063) 3.658,53.902 3.675,53.885 ccw(c4.991,55.201) 4.991,53.34 17.861,53.34 ccw(c17.861,53.848) 18.369,53.848 v1(18.369,62.25) ; v1(18.369,70.766) 18.376,70.773 45.082,70.773 49.511,66.344 49.543,66.344 50.055,65.832 U1.15@50.071,65.832
  Bottom Layer w0.178: v1(18.369,62.25) v1(18.369,70.766)
LCD_D19: J4.8 U1.14 | length 68.4
  Top Layer w0.178: J4.8@1.345,54.75 2.93,54.75 cw(c2.93,53.21) 4.019,54.299 ; 4.019,54.298 ccw(c5.107,55.388) 5.107,53.848 16.972,53.848 ccw(c16.972,54.35) 17.474,54.35 v1(17.474,62.25) ; v1(17.474,71.289) 45.179,71.289 U1.14@50.353,66.115
  Bottom Layer w0.178: v1(17.474,62.25) v1@17.474,71.12
LCD_D20: J4.9 U1.13 | length 67.8
  Top Layer w0.178: J4.9@1.373,55.278 16.029,55.278 ccw(c16.029,55.827) 16.579,55.827 v1(16.579,62.25) ; v1(16.579,71.811) 45.222,71.811 U1.13@50.636,66.397
  Bottom Layer w0.178: v1(16.579,62.25) v1(16.579,71.811)
LCD_D21: J4.10 U1.11 | length 68.5
  Top Layer w0.178: J4.10@1.345,55.75 15.2,55.75 ccw(c15.2,56.233) 15.684,56.233 v1(15.684,62.25) ; v1(15.684,72.334) 45.831,72.334 U1.11@51.202,66.963
  Bottom Layer w0.178: v1(15.684,62.25) v1(15.684,72.334)
LCD_D22: J4.11 U1.7 | length 71
  Top Layer w0.178: J4.11@1.345,56.25 14.253,56.25 ccw(c14.253,56.786) 14.788,56.786 v1(14.788,62.25) ; v1(14.788,74.003) 46.425,74.003 U1.7@52.333,68.094
  Bottom Layer w0.178: v1(14.788,62.25) v1(14.788,74.003)
LCD_D23: J4.12 U1.6 | length 71.3
  Top Layer w0.178: J4.12@1.345,56.75 13.312,56.75 ccw(c13.312,57.331) 13.893,57.331 v1(13.893,62.25) ; v1(13.893,74.528) 46.466,74.528 U1.6@52.616,68.377
  Bottom Layer w0.178: v1(13.893,62.25) v1(13.893,74.528)
LCD_DE: J4.34 U1.36 | length 52.2
  Top Layer w0.178: J4.34@1.345,67.75 10.729,67.75 cw(c10.729,66.567) 11.565,67.404 ; 11.566,67.403 ccw(c12.401,68.24) 12.401,67.057 v1(19.264,67.057) ; v1(19.264,62.25) 38.45,62.25 43.374,57.326 45.241,57.326 U1.36@46.111,58.195
  Bottom Layer w0.178: v1(19.264,62.25) v1(19.264,67.057)
LCD_HSYNC: J4.32 U1.35 | length 53.6
  Top Layer w0.178: J4.32@1.345,66.75 3.768,66.75 v1(3.826,66.692) ; v1(4.953,61.29) 8.386,61.29 ccw(c8.386,61.702) 8.799,61.702 8.799,62.546 cw(c9.169,62.546) 9.169,62.916 9.417,62.916 38.484,62.916 43.719,57.681 45.031,57.681 U1.35@45.828,58.478
  Bottom Layer w0.178: v1(3.826,66.692) 4.63,66.692 cw(c4.63,66.369) 4.953,66.369 v1(4.953,61.29)
LCD_PB2: R83.1 U1.41 | length 40.5
  Top Layer w0.178: v1(19.952,60.858) 37.821,60.858 43.357,55.322 46.066,55.322 U1.41@47.525,56.781
  Bottom Layer w0.178: R83.1@17.062,53.58 19.57,53.58 ccw(c19.57,53.963) 19.952,53.963 v1(19.952,60.858)
LCD_VSYNC: J4.33 U1.34 | length 52.9
  Top Layer w0.178: J4.33@1.347,67.247 v1@5.416,67.247 ; v1(5.853,61.845) 5.853,62.838 cw(c6.288,62.838) 6.288,63.272 6.762,63.272 38.828,63.272 44.053,58.047 44.831,58.047 U1.34@45.545,58.761
  Bottom Layer w0.178: v1@5.391,67.199 5.416,67.174 5.416,62.901 ccw(c6.909,62.901) v1(5.853,61.845)
  other v1: 5.416,67.23
M_RST: R118.2 U18.6 | length 15.2
  Top Layer w0.254: R118.2@29.608,115.468 29.608,116.195 cw(c30.06,116.195) 30.06,116.647 v1(34.735,116.647)
  Bottom Layer w0.254: v1(34.735,116.647) 34.735,115 ccw(c35.309,115) 35.309,114.426 U18.6@41.861,114.426
MB_RXD: J10.5
MB_TXD: J10.6
MCU_RST: U1.44 U18.11 | length 123.1
  Top Layer w0.178: v1(24.038,59.792) 36.912,59.792 43.355,53.348 45.789,53.348 U1.44@48.373,55.933
  Bottom Layer w0.254: v1(24.038,59.792) 24.038,74.528 cw(c25.054,74.528) 25.054,75.544 45.775,75.544 ccw(c45.775,76.378) 46.609,76.378 46.609,84.709 cw(c47.193,84.709) 47.193,85.293 57.958,85.293 ccw(c57.958,86.159) 58.823,86.159 58.823,113.935 ccw(c58.333,113.935) 58.333,114.426 U18.11@51.611,114.426
NET_MODE: Q3.2 U14.5 | length 111.5
  Top Layer w0.254: Q3.2@34.666,18.35 34.669,18.347 34.669,16.805 ccw(c35.666,16.805) 35.129,15.964 v1(35.666,15.621)
  Top Layer w0.381: v1(76.101,74.398) U14.5@76.1,76.25
  Bottom Layer w0.254: v1(35.666,15.621) 41.983,15.621 ccw(c41.983,16.564) 42.926,16.564 42.926,53.53 ccw(c42.357,53.53) 42.357,54.099 39.228,54.099 cw(c39.228,54.609) 38.718,54.609 38.718,73.754 cw(c39.361,73.754) 39.361,74.398 v1(76.101,74.398)
NET_STATUS: Q2.2 U14.6 | length 123.8
  Top Layer w0.254: Q2.2@34.666,8.35 34.666,6.362 v1(34.669,6.36)
  Top Layer w0.381: v1(77.4,74) U14.6@77.4,76.25
  Bottom Layer w0.254: v1(34.669,6.36) 34.669,15.621 cw(c35.304,15.621) 35.304,16.256 41.783,16.256 ccw(c41.783,16.83) 42.357,16.83 42.357,53.022 ccw(c41.85,53.022) 41.85,53.53 38.718,53.53 cw(c38.718,54.181) 38.066,54.181 38.066,74.358 cw(c38.737,74.358) 38.737,75.029 76.971,75.029 cw(c76.971,74.6) 77.4,74.6 v1(77.4,74)
NetC8_1: C8.1 R12.2 | length 4.9
  Top Layer w0.635: C8.1@7.64,40.1 7.64,38.608 ccw(c8.246,38.608) 8.246,38.001 R12.2@10.662,38.001
NetC10_2: C10.2 U3.1 X3.1 | length 4.7
  Top Layer w0.254: U3.1@19.77,37.996 21.247,37.996 cw(c21.247,37.366) 21.704,37.8 21.762,37.739 X3.1@22.535,37.366 ccw(c22.535,36.904) 22.074,36.904 C10.2@22.074,35.877
NetC53_1: C53.1 R39.2 | length 1.4
  Bottom Layer w0.508: R39.2@8.864,76.365 8.877,76.378 10.251,76.378 C53.1@10.264,76.391
NetC53_2: C53.2 L1.1 U5.5 | length 0.1
  Bottom Layer w0.203: C53.2@10.201,77.915 C53.2@10.264,77.915
NetC54_1: C54.1 R42.2 | length 1.3
  Top Layer w0.508: C54.1@25.002,106.613 R42.2@26.345,106.613
NetC54_2: C54.2 L2.1 U6.26
NetC56_2: C56.2 U5.7 | length 2.4
  Bottom Layer w0.203: C56.2@7.464,77.915 7.807,78.141 ccw(c7.086,78.592) 7.936,78.592 7.936,78.701 U5.7@7.936,80.122
NetC62_1: C62.1 R49.2 U6.23 | length 6.4
  Top Layer w0.203: C62.1@31.891,105.063 31.891,105.038 31.891,103.433 33.615,101.708 33.615,101.283 U6.23@33.238,100.906
  Top Layer w0.508: R49.2@30.504,105.089 C62.1@31.865,105.089
NetC63_1: C63.1 R49.1 | length 1.4
  Top Layer w0.508: C63.1@29.083,106.587 R49.1@30.504,106.587
NetC65_1: C65.1 R52.2 | length 1.4
  Top Layer w0.508: C65.1@35.627,86.705 R52.2@35.627,88.124
NetC65_2: C65.2 L3.1 U6.10 | length 1.5
  Top Layer w0.203: L3.1@38.5,86.554 L3.1@38.5,88.104
NetC69_1: C69.1 R56.1 U6.7 | length 8.5
  Top Layer w0.203: R56.1@31.213,88.141 R56.1@31.23,88.124 ; C69.1@31.213,89.541 31.213,89.604 30.331,90.486 30.331,94.461 U6.7@31.562,95.694 U6.7@31.562,95.694
  Top Layer w0.381: R56.1@31.213,88.141 C69.1@31.213,89.541
NetC70_1: C70.1 R56.2 | length 1.4
  Top Layer w0.508: C70.1@32.754,86.705 R56.2@32.754,88.124
NetC71_2: C71.2 U6.24 | length 7.6
  Top Layer w0.203: C71.2@27.714,105.063 27.714,103.683 28.001,103.396 30.748,103.396 U6.24@32.884,101.259
NetC72_1: C72.1 R57.2 | length 1.4
  Top Layer w0.508: C72.1@41.908,96.473 R57.2@41.908,97.894
NetC72_2: C72.2 L4.1 U6.15
NetC74_2: C74.2 U6.8 | length 4.6
  Top Layer w0.203: C74.2@31.213,91.034 31.213,94.638 U6.8@31.916,95.341
NetC75_1: C75.1 R58.2 | length 1.4
  Top Layer w0.381: R58.2@61.456,107.139 C75.1@62.897,107.14
NetC75_2: C75.2 L5.1 U7.2 | length 13.8
  Top Layer w0.254: L5.1@53.799,109.606 ccw(c54.014,109.606) 54.014,109.391 L5.1@55.414,109.391 ; U7.2@58.011,109.391 L5.1@55.414,109.391 ; C75.2@62.897,108.664 62.897,108.136 cw(c62.662,108.136) 62.662,107.901 55.865,107.901 cw(c55.865,108.353) 55.414,108.353 L5.1@55.414,109.391
NetC84_2: C84.2 U6.17 | length 5.2
  Top Layer w0.203: U6.17@35.359,98.784 35.889,99.315 C84.2@40.384,99.315
NetC85_1: C85.1 R65.1 U6.18 | length 8
  Top Layer w0.203: U6.18@35.006,99.138 38.024,102.156 R65.1@40.384,102.156
  Top Layer w0.508: C85.1@40.415,100.766 R65.1@40.415,102.125
NetC86_1: C86.1 R65.2 | length 1.4
  Top Layer w0.508: R65.2@41.908,102.156 C86.1@41.908,103.577
NetC99_2: C99.2 U13.11 | length 6.1
  Top Layer w0.254: C99.2@66.84,48.164 66.84,46.905 ccw(c67.21,46.905) 67.21,46.535 69.62,46.535 cw(c69.62,46.174) 69.982,46.174 69.982,45.59 U13.11@69.982,44.917
NetC137_2: C137.2 D15.1 J5.1 R101.1 | length 4.4
  Top Layer w0.343: R101.1@77.383,111.97 77.383,116.383 J5.1@77.4,116.4
NetC141_2: C141.2 D16.1 J6.1 R109.1 | length 4.3
  Top Layer w0.178: J6.1@106.367,103.275 J6.1@106.367,103.292
  Top Layer w0.343: R109.1@102.07,103.275 J6.1@106.367,103.275
NetC144_1: C144.1 C145.2 R113.1 | length 2.1
  Top Layer w0.178: R113.1@83.092,111.97 R113.1@83.1,111.978
  Top Layer w0.343: R113.1@83.1,111.978 C144.1@83.1,114.03
NetC144_2: C144.2 J8.1 L7.2 | length 2.7
  Top Layer w0.178: L7.2@84.37,114.97 L7.2@84.4,115
  Top Layer w0.343: J8.1@83.1,116.375 C144.2@83.1,114.97 L7.2@84.37,114.97
NetC151_1: C151.1 U20.6
NetC151_2: C151.2 L8.1 U20.5
NetD9_2: D9.2 R12.1 U3.8 | length 3.6
  Top Layer w0.381: D9.2@12.183,39.394 12.186,39.394 R12.1@12.186,38.001 12.186,37.996 U3.8@14.37,37.996
NetD11_2: D11.2 R112.1 | length 3.2
  Top Layer w0.343: R112.1@87.1,113.738 87.1,112.356 ccw(c87.4,112.356) 87.4,112.056 D11.2@88.74,112.056
NetL6_2: L6.2 U12.6
NetL7_1: L7.1 R112.2 | length 1.4
  Top Layer w0.343: L7.1@85.8,115 85.999,115.199 87.037,115.199 R112.2@87.1,115.262
NetLED1_2: LED1.2 R77.1 | length 3.1
  Top Layer w0.508: R77.1@13.716,19.4 LED1.2@16.83,19.4
NetLED2_1: LED2.1 R78.1 | length 2.1
  Top Layer w0.508: R78.1@29,79.662 v1(29,80.718)
  Bottom Layer w0.508: v1(29,80.718) LED2.1@29,81.722
NetLED3_1: LED3.1 R79.1 | length 2.1
  Top Layer w0.508: R79.1@31,79.662 v1(31,80.718)
  Bottom Layer w0.508: v1(31,80.718) LED3.1@31,81.722
NetLED4_1: LED4.1 R80.1 | length 2.1
  Top Layer w0.508: R80.1@33,79.662 v1(33,80.718)
  Bottom Layer w0.508: v1(33,80.718) LED4.1@33,81.722
NetLED5_1: LED5.1 R81.1 | length 1.9
  Top Layer w0.508: v1(35,80.718) R81.1@35,81.661
  Bottom Layer w0.508: v1(35,80.718) LED5.1@35,81.722
NetLED5_2: LED5.2 Q8.3 | length 5
  Bottom Layer w0.508: LED5.2@35,83.31 Q8.3@35,88.333
NetLED6_1: LED6.1 Q2.3 | length 2.7
  Top Layer w0.508: LED6.1@32.37,9.4 Q2.3@35.115,9.4
NetLED6_2: LED6.2 R97.1 | length 3.2
  Top Layer w0.508: R97.1@26.67,9.4 LED6.2@29.83,9.4
NetLED7_1: LED7.1 Q3.3 | length 2.7
  Top Layer w0.508: LED7.1@32.37,19.4 Q3.3@35.115,19.4
NetLED7_2: LED7.2 R98.1 | length 3.1
  Top Layer w0.508: R98.1@26.716,19.4 LED7.2@29.83,19.4
NetLED8_1: LED8.1 R114.1 | length 1.6
  Bottom Layer w0.178: R114.1@68,96.838 ccw(c68.09,96.838) R114.1@68.09,96.748
  Bottom Layer w0.381: R114.1@68.09,96.748 LED8.1@69.507,96.748
NetLED9_1: 
NetLED10_1: LED10.1 R120.1 | length 2.1
  Bottom Layer w0.381: R120.1@17.349,15.202 LED10.1@19.473,15.202
NetLED10_2: LED10.2 Q6.3 | length 4
  Bottom Layer w0.254: LED10.2@19.473,13.702 LED10.2@19.474,13.701
  Bottom Layer w0.381: LED10.2@19.474,13.701 Q6.3@23.504,13.699
NetLED11_1: LED11.1 Q7.3 | length 2.7
  Top Layer w0.508: LED11.1@19.37,9.4 Q7.3@22.115,9.4
NetLED11_2: LED11.2 R121.1 | length 3.1
  Top Layer w0.508: R121.1@13.716,9.4 LED11.2@16.83,9.4
NetLS1_2: LS1.2 Q1.3 | length 3.6
  Top Layer w0.762: Q1.3@89.864,24.006 LS1.2@93.432,24.006
NetQ1_1: Q1.1 R17.2 | length 1.2
  Top Layer w0.508: R17.2@88.822,20.761 Q1.1@88.822,22.006
NetQ8_2: Q8.2 R128.2 | length 1.7
  Bottom Layer w0.381: Q8.2@35.95,90.333 Q8.2@36.02,90.403 ; R128.2@36.02,91.899 R128.2@36.077,91.956
  Bottom Layer w0.508: Q8.2@36.02,90.403 R128.2@36.02,91.899
NetR9_1: R9.1 U1.94 | length 3.1
  Top Layer w0.178: v1@62.89,59.8 U1.94@64.212,58.478
  Bottom Layer w0.178: R9.1@63.776,58.94 R9.1@63.776,58.95
  Bottom Layer w0.381: v1(62.895,59.805) R9.1@63.76,58.94
NetR13_2: R13.2 R14.1 SW3.3 SW3.4 | length 22.6
  Top Layer w0.254: 46.65,25.069 ccw(c46.719,25.069) 46.719,25.001
  Top Layer w0.381: R13.2@44.4,27.723 46.09,27.723 SW3.3@46.65,26.85
  Top Layer w0.508: 46.608,24.587 54.687,24.587 ccw(c54.687,25.3) 55.4,25.3 R14.1@55.4,26.716
  Top Layer w0.762: SW3.4@46.65,17.75 46.65,25.069 SW3.3@46.65,26.85
NetR14_2: R14.2 R15.1 SW4.3 SW4.4 | length 22.5
  Top Layer w0.254: 57.65,25.092 ccw(c57.708,25.092) 57.708,25.033
  Top Layer w0.381: R14.2@55.4,27.723 57.09,27.723 SW4.3@57.65,26.85
  Top Layer w0.508: 57.708,24.587 65.787,24.587 ccw(c65.787,25.3) 66.5,25.3 R15.1@66.5,26.716
  Top Layer w0.762: SW4.4@57.65,17.75 57.65,25.033 57.65,25.092 SW4.3@57.65,26.85